# Altium PCB PCBAction.PcbDoc
Units mm, origin at the board's own origin, x right, y up, seen from the top; angles counter-clockwise.
Board outline 93.5 x 70 mm, 2 copper layers (Top Layer, Bottom Layer); 66 components, 68 nets, 274 pads, 15 vias.
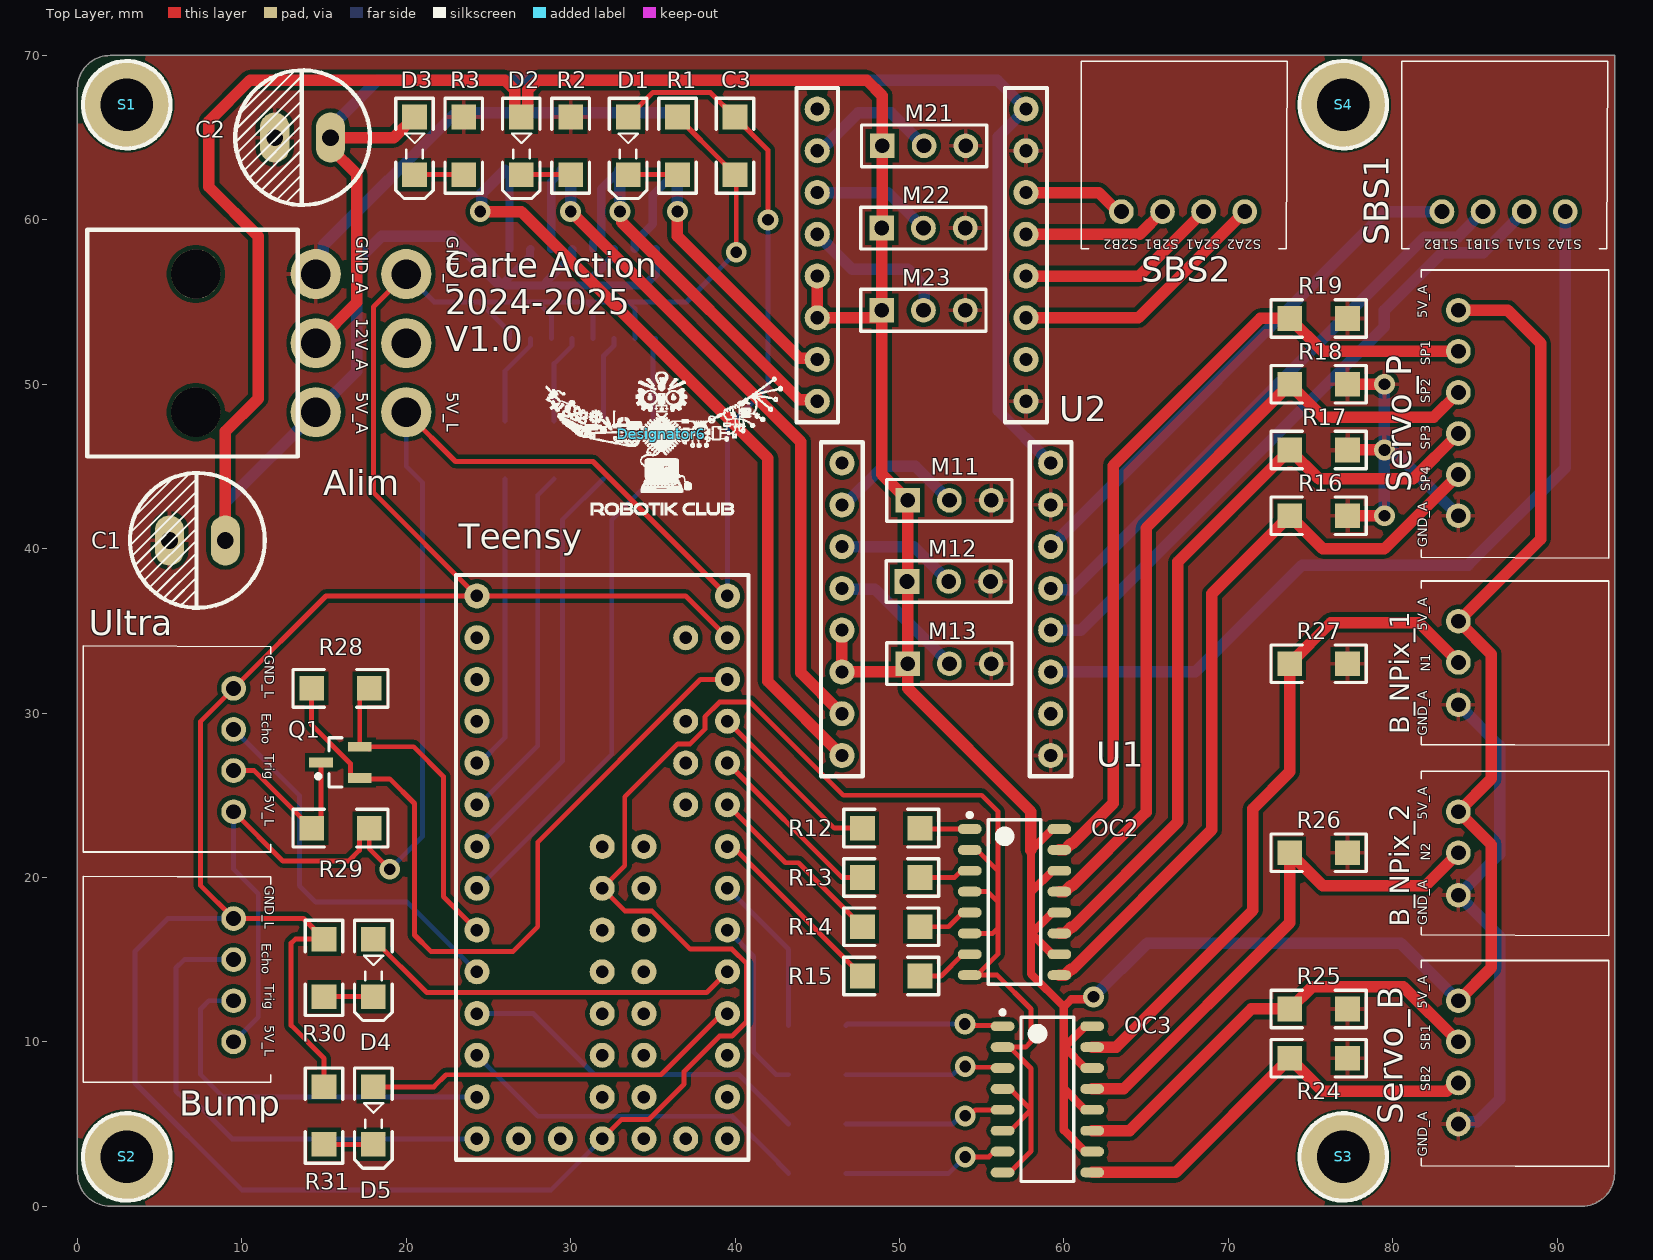
[diagram p0: Top Layer view]
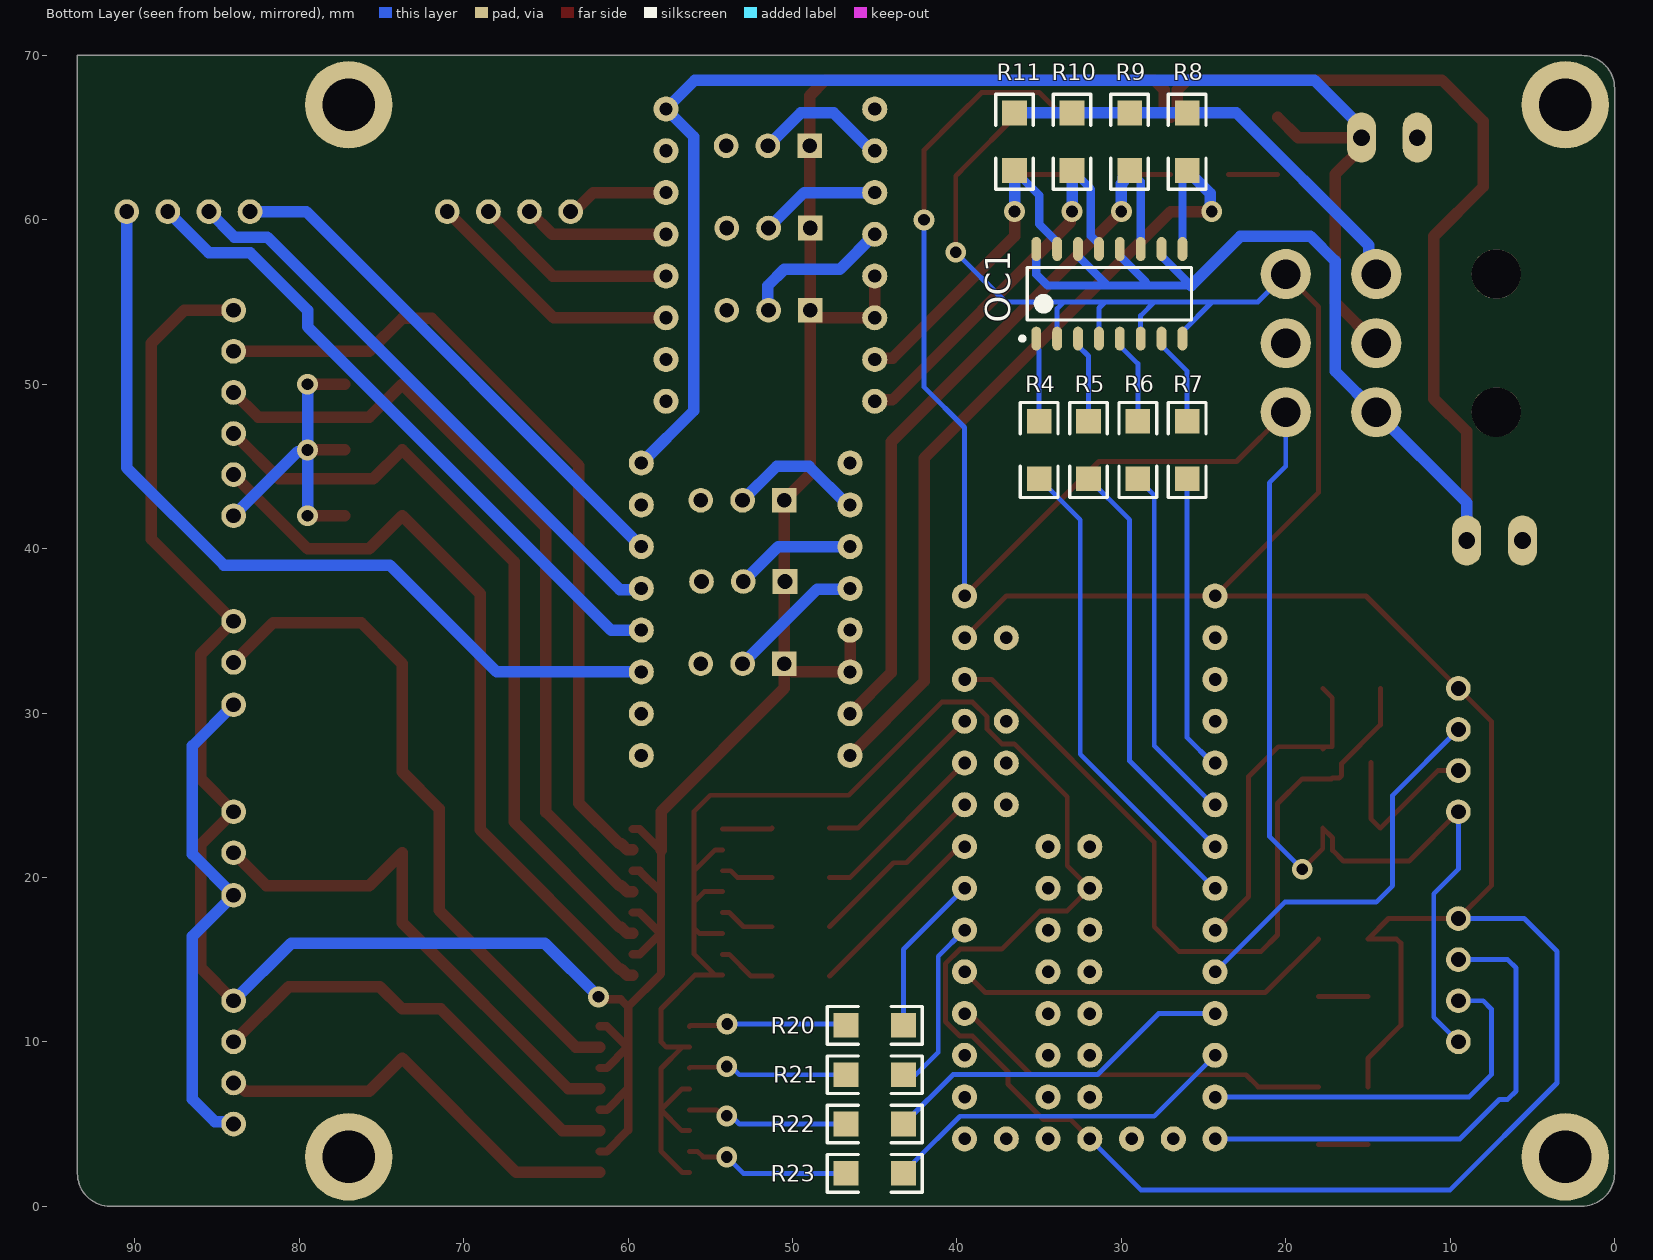
[diagram p1: Bottom Layer view, seen from below]
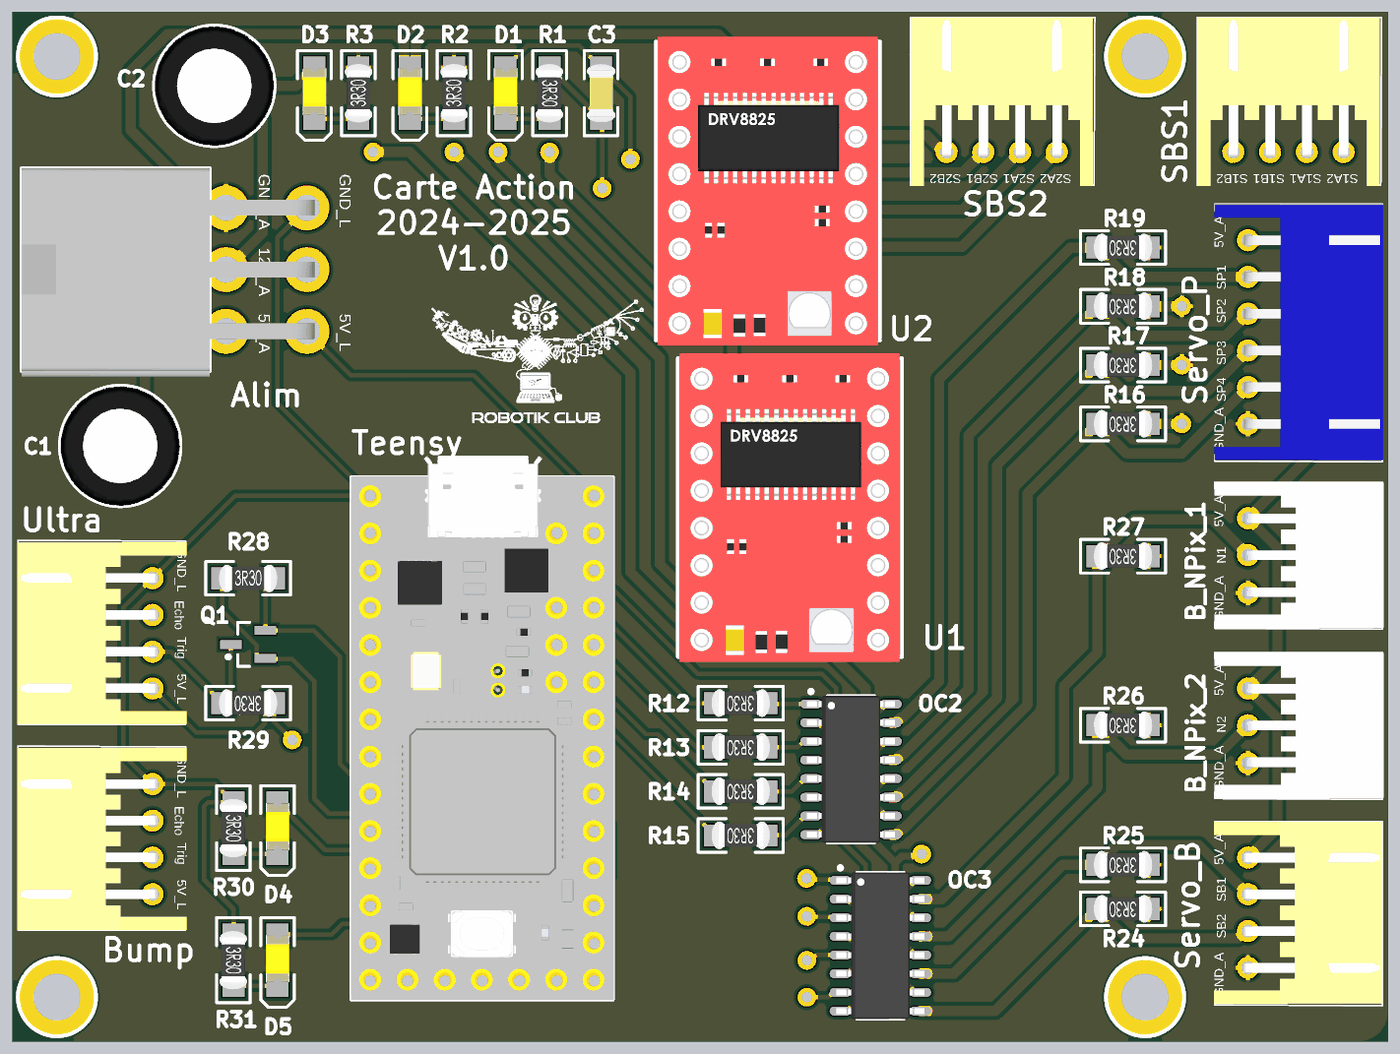
[diagram p2: 3D render of the assembled board from above, using the file's embedded part models]
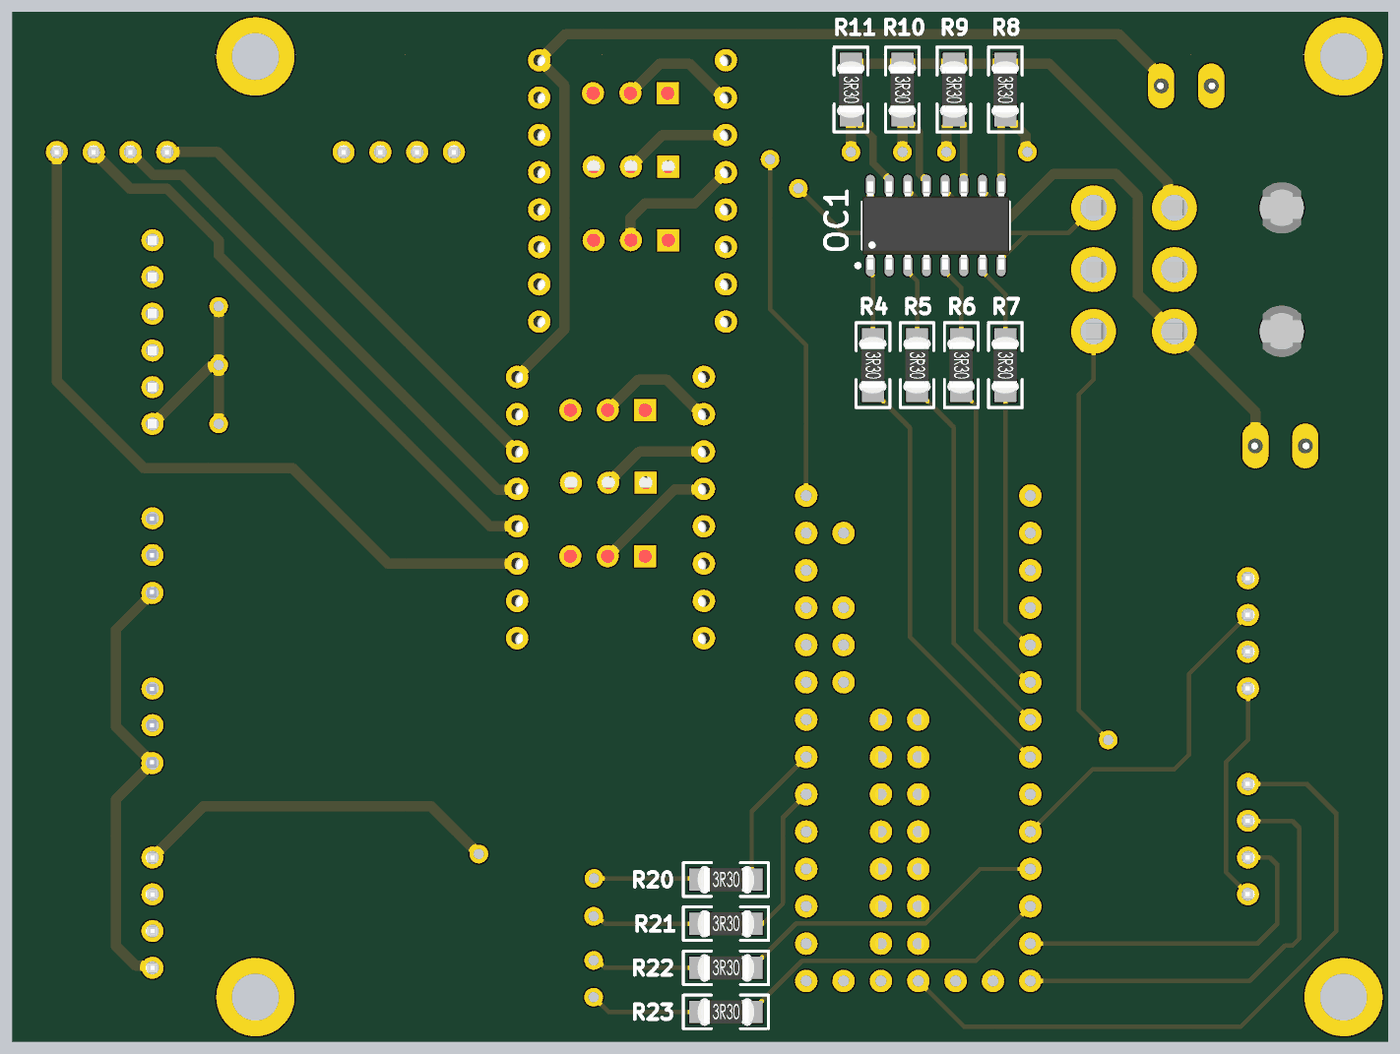
[diagram p3: 3D render of the assembled board from below, using the file's embedded part models]

## Layer stack, top to bottom
Top Solder: solder mask 0.0102, Solder Resist, Dk 3.5
Top Layer: signal copper 0.0356
Dielectric 1: dielectric 0.32, FR-4, Dk 4.8
Bottom Layer: signal copper 0.0356
Bottom Solder: solder mask 0.0102, Solder Resist, Dk 3.5

## Board outline
2,0 91.5,0 ccw(c91.5,2) 93.5,2 93.5,70 2,70 ccw(c2,68) 0,68 0,2 ccw(c2,2)

## Design rules (kind name [scope] priority, off if disabled: settings)
Clearance [All] p1: gap=0.254 ignorepadtopadclearanceinfootprint=FALSE
PolygonConnect [All] p1: connectstyle=Relief reliefconductorwidth=0.254 reliefentries=4 polygonreliefangle="90 Angle" airgapwidth=0.254
RoutingVias [All] p1: holewidth=0.711 width=1.27 viastyle="Through Hole" minholewidth=0.711 minwidth=1.27 maxholewidth=0.711 maxwidth=1.27
SolderMaskExpansion [All] p1: expansion=0.102 istentingtop=FALSE
SupplyNets "Schematic Supply Nets_5" [InNet('5V_A')] p1: voltage=0.000
SupplyNets "Schematic Supply Nets_4" [InNet('GND_L')] p2: voltage=0.000
SupplyNets "Schematic Supply Nets_3" [InNet('5V_L')] p3: voltage=0.000
SupplyNets "Schematic Supply Nets_2" [InNet('GND_A')] p4: voltage=0.000
SupplyNets "Schematic Supply Nets_1" [InNet('3V_L')] p5: voltage=0.000
SupplyNets "Schematic Supply Nets" [InNet('12V_A')] p6: voltage=0.000
Width [All] p1: maxlimit=0.7 minlimit=0.3 preferedwidth=0.7
30 further rules are at their usual default settings.

## Classes and differential pairs
component class SchemaAction: Alim Bump C1 C2 C3 D1 D2 D3 D4 D5 Q1 R1 R2 R3 R28 R29 R30 R31 S1 S2 S3 S4 Teensy Ultra
component class SchemaAction_Actionneurs: B_NPix_1 B_NPix_2 M11 M12 M13 M21 M22 M23 OC1 OC2 OC3 R4 R5 R6 R7 R8 R9 R10 R11 R12 R13 R14 R15 R16 R17 R18 R19 R20 R21 R22 R23 R24 R25 R26 R27 SBS1 SBS2 Servo_B Servo_P U1 U2

## Components (designator, comment, footprint, x,y, rotation, side; value= is the part's Value field where it differs from the comment)
Alim "Header 3X2H" MOLEX_MINIFITJR_3X2 14.5,52.5 r270 top
B_NPix_1 "S3B-XH-A" S3B-XH-A 84,35.58 r270 top
B_NPix_2 "S3B-XH-A" S3B-XH-A 84,24 r270 top
Bump "Header 4H" S4B-XH-A 9.5,10 r90 top
C1 "Cap2" Condensateur 9,40.5 r180 top value=100µF
C2 "Cap2" Condensateur 15.4,65 r180 top value=100µF
C3 "(Optional)" "Capacitor 1206" 40,64.5 r90 top value=10uF
D1 "5V_L" KP-3216SEC 33.5,64.5 r270 top
D2 "5V_A" KP-3216SEC 27,64.5 r270 top
D3 "12V_A" KP-3216SEC 20.5,64.5 r270 top
D4 "LED1" KP-3216SEC 18,14.5 r270 top
D5 "LED2" KP-3216SEC 18,5.516 r270 top
Designator6 "Comment" Logo_lowres 35.5,47 r0 top
M11 "Header 3" HDR1X3 50.5,42.937 r0 top
M12 "Header 3" HDR1X3 50.46,38 r0 top
M13 "Header 3" HDR1X3 50.5,33 r0 top
M21 "Header 3" HDR1X3 48.96,64.5 r0 top
M22 "Header 3" HDR1X3 48.92,59.5 r0 top
M23 "Header 3" HDR1X3 48.92,54.5 r0 top
OC1 "PhotoCoupler" "16 pins SOIC, TI" 30.73,55.5 r90 bottom
OC2 "PhotoCoupler" "16 pins SOIC, TI" 57,18.5 r0 top
OC3 "PhotoCoupler" "16 pins SOIC, TI" 59,6.5 r0 top
Q1 "MOSFET-N" SOT23_M 16,27 r180 top
R1 "Res2" "Resistor 1206" 36.5,64.5 r270 top value=300
R2 "Res2" "Resistor 1206" 30,64.5 r90 top value=300
R3 "Res2" "Resistor 1206" 23.5,64.5 r90 top value=1K3
R4 "Res2" "Resistor 1206" 35,46 r270 bottom value=210
R5 "Res2" "Resistor 1206" 32,46 r270 bottom value=210
R6 "Res2" "Resistor 1206" 29,46 r270 bottom value=210
R7 "Res2" "Resistor 1206" 26,46 r270 bottom value=210
R8 "Res2" "Resistor 1206" 26,64.75 r270 bottom value=10K
R9 "Res2" "Resistor 1206" 29.5,64.75 r270 bottom value=10K
R10 "Res2" "Resistor 1206" 33,64.75 r270 bottom value=10K
R11 "Res2" "Resistor 1206" 36.5,64.75 r270 bottom value=10K
R12 "Res2" "Resistor 1206" 49.5,23 r180 top value=210
R13 "Res2" "Resistor 1206" 49.5,20 r180 top value=210
R14 "Res2" "Resistor 1206" 49.5,17 r180 top value=210
R15 "Res2" "Resistor 1206" 49.5,14 r180 top value=210
R16 "Res2" "Resistor 1206" 75.5,42 r180 top value=10K
R17 "Res2" "Resistor 1206" 75.5,46 r180 top value=10K
R18 "Res2" "Resistor 1206" 75.5,50 r180 top value=10K
R19 "Res2" "Resistor 1206" 75.5,54 r180 top value=10K
R20 "Res2" "Resistor 1206" 45,11 r180 bottom value=210
R21 "Res2" "Resistor 1206" 45,8 r180 bottom value=210
R22 "Res2" "Resistor 1206" 45,5 r180 bottom value=210
R23 "Res2" "Resistor 1206" 45,2 r180 bottom value=210
R24 "Res2" "Resistor 1206" 75.5,9 r180 top value=10K
R25 "Res2" "Resistor 1206" 75.5,12 r180 top value=10K
R26 "Res2" "Resistor 1206" 75.5,21.5 r180 top value=10K
R27 "Res2" "Resistor 1206" 75.5,33 r180 top value=10K
R28 "Res2" "Resistor 1206" 16,31.5 r0 top value=10K
R29 "Res2" "Resistor 1206" 16,23 r180 top value=10K
R30 "Res2" "Resistor 1206" 15,14.5 r270 top value=300
R31 "Res2" "Resistor 1206" 15,5.516 r270 top value=300
S1 "Screw M3" "Screw M3" 3,67 r0 top
S2 "Screw M3" "Screw M3" 3,3 r0 top
S3 "Screw M3" "Screw M3" 77,3 r0 top
S4 "Screw M3" "Screw M3" 77,67 r0 top
SBS1 "Header 4" S4B-XH-A 83,60.5 r0 top
SBS2 "Header 4" S4B-XH-A 63.5,60.5 r0 top
Servo_B "Header 4H" S4B-XH-A 84,12.5 r270 top
Servo_P "Header 6H" S6B-XH-A 84,54.5 r270 top
Teensy "Teensy 3.2" teensy 21.76,16.8 r0 top
U1 "DRV8825" DRV8825 46.5,45.2 r0 top
U2 "DRV8825" DRV8825 45,66.74 r0 top
Ultra "Header 4H" S4B-XH-A 9.5,24 r90 top

## Footprints (in the part's own frame and the unit in brackets; to place one, negate y for a bottom-side part, rotate by r counter-clockwise, add the part's x,y. Pads: shape width x height; smd on the part's side, far side on the other; paste and mask are expansions set on the pad)
"16 pins SOIC, TI" [mm] "SOIC, 16-Leads, Body 9,90x3,90mm, Pitch 1,27mm, IPC Medium Density"
  oval 1.45x0.6 smd: 1(-2.725,4.445) 2(-2.725,3.175) 3(-2.725,1.905) 4(-2.725,0.635) 5(-2.725,-0.635) 6(-2.725,-1.905) 7(-2.725,-3.175) 8(-2.725,-4.445) 9(2.725,-4.445) 10(2.725,-3.175) 11(2.725,-1.905) 12(2.725,-0.635) 13(2.725,0.635) 14(2.725,1.905) 15(2.725,3.175) 16(2.725,4.445)
  silkscreen extent -2.85,-5 1.6,5.42, body extent -3,-5 3,5, height 1.75
"Capacitor 1206" [mm]
  rect 1.5x1.5 smd: 1(-1.75,0) 2(1.75,0)
  silkscreen extent -2.89,-1.14 2.89,1.14, body extent -1.98,-0.99 1.98,0.96, height 1.3
Condensateur [mil]
  oval 70x120 hole 40: 1(0,0) 2(133.86,0)
  silkscreen extent -94,-161 228,161, body extent -93,-160 227,160, height 500
DRV8825 [mil] "Stepper Driver"
  round 60 hole 31.5: 1(0,0) 2(0,-100) 3(0,-200) 4(0,-300) 5(0,-400) 6(0,-500) 7(0,-600) 8(0,-700) 9(500,-700) 10(500,-600) 11(500,-500) 12(500,-400) 13(500,-300) 14(500,-200) 15(500,-100) 16(500,0)
  silkscreen extent -50,-750 550,50, body extent -50,-764 550,63, height 446
HDR1X3 [mm] "Connector; Header; 3 Position"
  rect 1.5x1.5 hole 0.9: 1(0,0)
  round 1.5 hole 0.9: 2(2.54,0) 3(5.08,0)
  silkscreen extent -1.27,-1.27 6.35,1.27
KP-3216SEC [mm]
  rect 1.5x1.5 smd: 1(-1.75,0) 2(1.75,0)
  silkscreen extent -2.89,-1.14 3.2,1.14, body extent -1.7,-0.79 1.5,0.81, height 1.1
Logo_lowres [mm]
  silkscreen extent -7.01,-4.93 7.39,3.76
MOLEX_MINIFITJR_3X2 [mm] "MOLEX_MINIFITJR_3X2, 39-30-1060"
  round 3.048 hole 1.8: 1(-4.2,5.5) 2(-4.2,0) 3(0,5.5) 4(0,0) 5(4.2,5.5) 6(4.2,0)
  round 3 hole 3 unplated: 10(-4.2,-7.3) 11(4.2,-7.3)
  silkscreen extent -6.9,-13.9 6.9,-1.1, body extent -6.9,-13.9 7.3,6.04, height 11.41
"Resistor 1206" [mm]
  rect 1.5x1.5 smd: 1(-1.75,0) 2(1.75,0)
  silkscreen extent -2.89,-1.14 2.89,1.14, body extent -1.98,-0.95 1.98,0.93, height 0.55
S3B-XH-A [mm]
  round 1.5 hole 0.9: 1(0,0) 2(2.5,0) 3(5.08,0)
  silkscreen extent -2.45,-2.26 7.54,9.14, body extent -2.44,-2.27 7.46,9.23, height 6.15
S4B-XH-A [mm]
  round 1.5 hole 0.9: 1(0,0) 2(2.5,0) 3(5,0) 4(7.5,0)
  silkscreen extent -2.45,-2.26 10.08,9.14, body extent -2.44,-2.32 9.96,9.18, height 6.15
S6B-XH-A [mm]
  round 1.5 hole 0.9: 1(0,0) 2(2.5,0) 3(5,0) 4(7.5,0) 5(10,0) 6(12.5,0)
  silkscreen extent -2.45,-2.26 15.08,9.14, body extent -2.45,-2.3 14.95,9.2, height 6.15
"Screw M3" [mm] "M3 iso Screw"
  round 5.32 hole 3.2 unplated: 0(0,0)
  silkscreen extent -2.66,-2.66 2.66,2.66
SOT23_M [mm] "SOT23, 3-Leads, Body 2.9x1.3mm, Pitch 0.95mm, Lead Span 2.3mm - Reverse Pinning, IPC Low Density"
  rect 1.45x0.6 smd: 1(1.175,0) 2(-1.175,-0.95) 3(-1.175,0.95)
  silkscreen extent -0.1,-1.5 1.47,1.5, body extent -0.7,-1.5 0.7,1.5, height 1.1
teensy [mil] "Teensy 3.2"
  round 60 hole 30: 0(100,700) 1(100,600) 2(100,500) 3(100,400) 4(100,300) 5(100,200) 6(100,100) 7(100,0) 8(100,-100) 9(100,-200) 10(100,-300) 11(100,-400) 12(100,-500) 13(700,-500) 14(700,-400) 15(700,-300) 16(700,-200) 17(700,-100) 18(700,0) 19(700,100) 20(700,200) 21(700,300) 22(700,400) 23(700,500) 24(400,0) 25(400,-100) 26(400,-200) 27(400,-300) 28(400,-400) 29(500,-400) 30(500,-300) 31(500,-200) 32(500,-100) 33(500,0) 34(600,400) 35(600,300) 36(400,200) 37(500,200) 38(600,500) 39(500,100) 40(400,100) 41(700,600) 42(700,700) 43(700,800) 44(100,800) 45(600,-500) 46(500,-500) 47(400,-500) 48(300,-500) 49(200,-500) 50(600,700)
  silkscreen extent 50,-550 750,850, body extent 48,-550 752,907, height 505

## Part data
Alim: "Header, 3-Pin, Dual row, Right Angle", LatestRevisionDate=17-Jul-2002, LatestRevisionNote="Re-released for DXP Platform.", Publisher="Altium Limited"
B_NPix_1 B_NPix_2: library part "Header 3H", "Header, 3-Pin, Right Angle", LatestRevisionDate=17-Jul-2002, LatestRevisionNote="Re-released for DXP Platform.", Publisher="Altium Limited"
Bump Servo_B Ultra: "Header, 4-Pin, Right Angle", LatestRevisionDate=17-Jul-2002, LatestRevisionNote="Re-released for DXP Platform.", Publisher="Altium Limited"
C1 C2: "Capacitor", PackageDescription="Capacitor; 2 Leads", PackageReference=CAPR5-4X5, Published=23-Sep-2002, Publisher="Altium Limited"
C3: library part Cap, "Capacitor", LatestRevisionDate=17-Jul-2002, LatestRevisionNote="Re-released for DXP Platform.", PackageDescription="Radial Cap, Thru-Hole; 2 Leads; 0.3 in Pin Spacing", PackageReference=RAD-0.3, Published=8-Jun-2000, Publisher="Altium Limited"
D1 D2 D3 D4: library part LED2, "Typical RED, GREEN, YELLOW, AMBER GaAs LED", LatestRevisionDate=17-Jul-2002, LatestRevisionNote="Re-released for DXP Platform.", PackageDescription="SM LED; 2 Flat Leads", PackageReference=3.2X1.6X1.1, PackageVersion=Feb-2002, Published=8-Jun-2000, Publisher="Altium Limited"
D5: "Typical RED, GREEN, YELLOW, AMBER GaAs LED", LatestRevisionDate=17-Jul-2002, LatestRevisionNote="Re-released for DXP Platform.", PackageDescription="SM LED; 2 Flat Leads", PackageReference=3.2X1.6X1.1, PackageVersion=Feb-2002, Published=8-Jun-2000, Publisher="Altium Limited"
M11 M12 M13 M21 M22 M23: "Header, 3-Pin", LatestRevisionDate=17-Jul-2002, LatestRevisionNote="Re-released for DXP Platform.", Publisher="Altium Limited"
OC1 OC2 OC3: library part LTV-247, "Integrated Circuit", Manufacturer_Name=Lite-On, Mouser Part Number=859-LTV-247, Arrow Part Number=LTV-247, Arrow Price/Stock=https://www.arrow.com/en/products/ltv-247/lite-on-technology, Datasheet Link=http://optoelectronics.liteon.com/upload/download/DS70-2009-0014/LTV-2X7%20sereis%20Mar17.PDF, Manufacturer_Part_Number=LTV-247, Mouser Price/Stock=https://www.mouser.co.uk/ProductDetail/Lite-On/LTV-247/?qs=9ayhpukWNmvWpoxQBzWkFA%3D%3D
Q1: "N-Channel MOSFET", LatestRevisionDate=17-Jul-2002, LatestRevisionNote="Re-released for DXP Platform.", PackageDescription="TO, Flat Index; 3 In-Line, Axial Leads; Body Dia. 4.6mm; Lead Dia. 0.5 mm (max)", PackageReference=E3, PackageVersion=1995/1996, Published=8-Jun-2000, Publisher="Altium Limited"
R1 R2 R3 R4 R5 R6 R7 R8 R9 R10 R11 R12 R13 R14 R15 R16 R17 R18 R19 R20 R21 R22 R23 R24 R25 R26 R27 R28 R29 R30 R31: "Resistor", LatestRevisionDate=17-Jul-2002, LatestRevisionNote="Re-released for DXP Platform.", PackageDescription="Axial Device, Thru-Hole; 2 Leads; 0.4 in Pin Spacing", PackageReference=AXIAL-0.4, Published=8-Jun-2000, Publisher="Altium Limited"
SBS1 SBS2: "Header, 4-Pin", LatestRevisionDate=17-Jul-2002, LatestRevisionNote="Re-released for DXP Platform.", Publisher="Altium Limited"
Servo_P: "Header, 6-Pin, Right Angle", LatestRevisionDate=17-Jul-2002, LatestRevisionNote="Re-released for DXP Platform.", Publisher="Altium Limited"
Teensy: library part teensy3.2
U1 U2: "Stepper Driver Module"

## Via types
v1: diameter 1.27, hole 0.711, Top Layer to Bottom Layer, 15 vias

## Nets (pads, with @x,y where several pads share a name; then routed paths per layer and width w, separated by ;. In a path a pad name is that pad's centre, name@x,y a point inside that pad or via, vN(x,y) a via of type N, cw(c..) or ccw(c..) an arc to the next point about the centre after c; other vN are vias at no path point)
3V_L: Q1.3 R28.1 Teensy.41 | length 48.2
  Top Layer w0.3: R28.1 14.25,29.279 16.6,26.929 16.6,26.2 16.75,26.05 Q1.3 17.225,26 19,26 20.5,24.5 20.5,16.5 21.5,15.5 26.5,15.5 28,17 28,22.149 37.891,32.04 Teensy.41 Teensy.41@39.52,32.04
5V_A: Alim.6 B_NPix_1.1 B_NPix_2.1 C1.1 D2.1 M11.1 M12.1 M13.1 M21.1 M22.1 M23.1 OC1.10 OC1.12 OC1.14 OC1.16 OC2.10 OC2.12 OC2.14 OC2.16 OC3.10 OC3.12 OC3.14 OC3.16 Servo_B.1 Servo_P.1 U1.5 U1.6 U2.5 U2.6 | length 301.5
  Top Layer w0.5: OC2.10 59.3,15.325 58,16.625 ; OC2.12 59.3,17.865 58.06,16.625 58,16.625 ; OC2.14 59.3,20.405 58.03,19.135 58,19.135 ; OC2.16 59.3,22.945 58,21.645 58,19.135 ; OC3.10 61.3,3.325 60,4.625 60,7.135 ; OC3.12 61.3,5.865 60.03,7.135 60,7.135 ; OC3.14 61.3,8.405 60.06,9.645 60,9.645 ; OC3.16 61.3,10.945 60,9.645 ; v1(61.807,12.737) 61.659,12.59 60.455,12.59 60,12.135 ; 58,16.625 58,14.135 60,12.135 ; 58,16.625 58,19.135 ; 60,7.135 60,9.645 ; 60,9.645 60,12.135
  Top Layer w0.7: C1.1 9,47.124 11,49.124 11,59 8,62 8,66 10.5,68.5 26,68.5 26.6,67.9 26.6,66.65 D2.1 27.4,66.65 27.4,67.9 28,68.5 48,68.5 48.96,67.54 M21.1 48.94,64.48 48.94,59.52 M22.1 M23.1 ; U2.5 U2.6 48.46,54.04 M23.1 ; U1.5 U1.6 50,32.5 M13.1 ; 58,21.645 58,24 50.5,31.5 M13.1 ; Servo_B.1 86,14.5 86,22 B_NPix_2.1 86,26 86,33.58 B_NPix_1.1 89,40.58 89,52.5 87,54.5 Servo_P.1 ; M23.1 48.92,44.517 M11.1 M13.1
  Bottom Layer w0.5: OC1.10 27.522,58.192 27.522,57.767 25.755,56 28.5,56 ; OC1.12 30.095,57.8 28.5,56.205 28.5,56 ; OC1.14 32.635,57.8 30.835,56 ; OC1.16 35.175,56.675 34.5,56 30.835,56 ; 28.5,56 30.835,56
  Bottom Layer w0.7: C1.1 9,42.8 Alim.6 17,50.8 17,57.5 18.5,59 22.755,59 25.755,56 ; v1(61.807,12.737) 65.069,16 80.5,16 Servo_B.1
5V_L: Alim.5 Bump.1 C3.2 D1.1 R29.1 Teensy.43 Ultra.1 | length 121
  Top Layer w0.3: Ultra.1 12.5,21 16.5,21 17.15,21.65 17.15,22.4 R29.1 17.75,21.75 v1(19,20.5) ; Alim.5 23,45.3 31.36,45.3 Teensy.43 ; D1.1 34.996,67.746 38.504,67.746 C3.2 42,64.25 v1(42,60)
  Bottom Layer w0.3: Bump.1 11,11.5 11,19 9.5,20.5 Ultra.1 ; v1(19,20.5) 21,22.5 21,44 20,45 Alim.5 ; Teensy.43 39.54,47.364 42,49.824 v1(42,60)
12V_A: Alim.4 C2.1 D3.1 U1.16 U2.16 | length 88.2
  Top Layer w0.7: Alim.4 17,55 17,62.765 15.4,64.365 C2.1 19.25,65 D3.1
  Bottom Layer w0.7: C2.1 15.4,65.635 18.265,68.5 55.94,68.5 U2.16 56,65.04 56,48.4 U1.16
GND_A: Alim.2 B_NPix_1.3 B_NPix_2.3 C1.2 C2.2 M11.3 M12.3 M13.3 M21.3 M22.3 M23.3 R2.2 R3.2 R8.1 R9.1 R10.1 R11.1 R16.1 R17.1 R18.1 R19.1 R24.1 R25.1 R26.1 R27.1 Servo_B.4 Servo_P.6 U1.9 U1.15 U2.9 U2.15 | length 78
  Top Layer w0.7: R16.1 v1(79.5,42) ; R17.1 v1(79.5,46) ; R18.1 v1(79.5,50)
  Bottom Layer w0.7: Alim.2 14.949,57.149 14.949,58.449 23,66.5 R8.1 R9.1 R10.1 R11.1 ; v1(79.5,42) v1(79.5,46) ; v1(79.5,50) v1(79.5,46) ; Servo_B.4 84.153,5.153 85.153,5.153 86.5,6.5 86.5,16.42 B_NPix_2.3 86.5,21.42 86.5,28 B_NPix_1.3 ; Servo_P.6 80.109,45.891 79.609,45.891 v1(79.5,46)
GND_L: Alim.1 Bump.4 C3.1 OC1.2 OC1.4 OC1.6 OC1.8 OC2.2 OC2.4 OC2.6 OC2.8 OC3.2 OC3.4 OC3.6 OC3.8 R1.1 R30.1 R31.1 Teensy.40 Teensy.42 Teensy.44 Teensy.47 Ultra.4 | length 278.5
  Top Layer w0.3: R31.1 15,9 13,11 13,16 13.25,16.25 R30.1 13.75,17.5 Bump.4 7.5,19.5 7.5,29.5 Ultra.4 15.12,37.12 Teensy.44 ; Alim.1 18,54.7 18,43.42 Teensy.44 ; Teensy.47 33.086,5.266 34.735,5.266 36.896,7.427 36.896,8.185 39.057,10.346 39.815,10.346 40.706,11.237 40.706,14.743 39.815,15.634 37.275,15.634 34.943,17.966 33.294,17.966 Teensy.40 33.294,20.714 33.294,24.903 36.517,28.126 37.275,28.126 38.166,29.017 38.166,29.775 39.057,30.666 40.917,30.666 46.583,25 55,25 56,24 56,20.375 ; R1.1 39.4,63.35 C3.1 40.076,62.674 v1(40.076,58.026) ; Teensy.42 37,37.12 Teensy.44 ; OC2.8 OC2.8@54.7,14.055 ; OC2.6 55.667,16.595 56,16.928 ; OC2.4 55.365,19.135 56,18.5 ; OC2.2 54.7,21.675 56,20.375 ; OC3.8 56.7,2.055 58,3.355 58,5.865 ; OC3.6 56.73,4.595 58,5.865 ; OC3.4 56.73,7.135 58,5.865 ; OC3.2 OC3.2@56.7,9.675 ; OC2.8@54.7,14.055 55.945,14.055 58,12 58,10 57.675,9.675 OC3.2@56.7,9.675 ; OC2.8@54.7,14.055 56,15.355 56,16.928 ; 56,16.928 56,18.5 ; 56,18.5 56,20.375 ; OC3.2@56.7,9.675 58,8.375 58,5.865
  Bottom Layer w0.3: Bump.4 5.5,17.5 3.5,15.5 3.5,7.5 10,1 28.82,1 Teensy.47 ; Alim.1 21.7,55 24.485,55 ; OC1.8 26.285,53.2 24.485,55 ; OC1.6 28.825,54.175 28,55 ; OC1.4 31.365,54.635 31,55 ; OC1.2 33.905,54.595 33.5,55 ; v1(40.076,58.026) 37.05,55 33.5,55 ; 24.485,55 28,55 ; 28,55 31,55 ; 31,55 33.5,55
LED_1: D4.1 Teensy.17 | length 23.4
  Top Layer w0.3: D4.1 21.25,13 38.28,13 Teensy.17
LED_2: D5.1 Teensy.16 | length 23.4
  Top Layer w0.3: D5.1 21.683,7.266 22.417,8 35.5,8 39.22,11.72 Teensy.16
NetD1_2: D1.2 R1.2 | length 3
  Top Layer w0.3: D1.2 R1.2
NetD2_2: D2.2 R2.1 | length 3
  Top Layer w0.3: D2.2 R2.1
NetD3_2: D3.2 R3.1 | length 3
  Top Layer w0.3: D3.2 R3.1
NetD4_2: D4.2 R30.2 | length 3
  Top Layer w0.3: R30.2 D4.2
NetD5_2: D5.2 R31.2 | length 3
  Top Layer w0.3: R31.2 D5.2
NetOC1_1: OC1.1 R4.1 | length 5.1
  Bottom Layer w0.3: R4.1 35,52.094 35.175,52.269 OC1.1
NetOC1_3: OC1.3 R5.1 | length 5.3
  Bottom Layer w0.3: R5.1 32,51.715 32.635,52.35 OC1.3
NetOC1_5: OC1.5 R6.1 | length 5.5
  Bottom Layer w0.3: R6.1 29,51.255 30.095,52.35 OC1.5
NetOC1_7: OC1.7 R7.1 | length 5.7
  Bottom Layer w0.3: R7.1 26,50.795 27.555,52.35 OC1.7
NetOC2_1: OC2.1 R12.1 | length 3
  Top Layer w0.3: R12.1 51.305,22.945 OC2.1
NetOC2_3: OC2.3 R13.1 | length 3.2
  Top Layer w0.3: R13.1 53.364,20 53.769,20.405 OC2.3
NetOC2_5: OC2.5 R14.1 | length 3.4
  Top Layer w0.3: R14.1 52.985,17 53.85,17.865 OC2.5
NetOC2_7: OC2.7 R15.1 | length 3.6
  Top Layer w0.3: R15.1 52.525,14 53.85,15.325 OC2.7
NetOC3_1: OC3.1 R20.1 | length 9.6
  Top Layer w0.3: v1(53.978,11.084) 54.059,11.002 56.218,11.002 OC3.1
  Bottom Layer w0.3: R20.1 46.834,11.084 v1(53.978,11.084)
NetOC3_3: OC3.3 R21.1 | length 9.8
  Top Layer w0.3: v1(54,8.5) 54.048,8.453 56.227,8.453 OC3.3
  Bottom Layer w0.3: R21.1 53.238,8 53.738,8.5 v1(54,8.5)
NetOC3_5: OC3.5 R22.1 | length 9.9
  Top Layer w0.3: v1(54,5.5) 54.262,5.5 54.627,5.865 OC3.5
  Bottom Layer w0.3: R22.1 53.238,5 53.738,5.5 v1(54,5.5)
NetOC3_7: OC3.7 R23.1 | length 10.1
  Top Layer w0.3: v1(54,3) 55.444,3 55.769,3.325 OC3.7
  Bottom Layer w0.3: R23.1 53,2 v1(54,3)
O_B_Neopixel_1: B_NPix_1.2 OC3.15 R27.2 | length 41.4
  Top Layer w0.7: OC3.15 63.175,9.675 71.5,18 71.5,24.175 73.75,26.425 R27.2 76.25,35.5 81.58,35.5 B_NPix_1.2
O_B_Neopixel_2: B_NPix_2.2 OC3.13 R26.2 | length 32.4
  Top Layer w0.7: OC3.13 63.635,7.135 73.75,17.25 R26.2 75.75,19.5 82,19.5 B_NPix_2.2
O_SBS_Dir_1: OC1.11 R9.2 U1.7 | length 45.1
  Top Layer w0.7: v1(30,60.5) 44,46.5 44,32.46 U1.7
  Bottom Layer w0.5: OC1.11 28.825,62.325 R9.2
  Bottom Layer w0.7: R9.2 29.9,62.6 29.9,62.285 30,62.185 v1(30,60.5)
O_SBS_Dir_2: OC1.15 R11.2 U2.7 | length 21.5
  Top Layer w0.7: v1(36.5,60.5) 36.5,59 43.919,51.581 44.919,51.581 U2.7
  Bottom Layer w0.5: OC1.15 33.905,58.65 35,59.745 35,61.5 R11.2
  Bottom Layer w0.7: v1(36.5,60.5) R11.2
O_SBS_Step_1: OC1.9 R8.2 U1.8 | length 51.7
  Top Layer w0.7: v1(24.5,60.5) 27,60.5 42,45.5 42,31.92 U1.8
  Bottom Layer w0.5: R8.2 26.285,62.715 OC1.9
  Bottom Layer w0.7: v1(24.5,60.5) 24.609,60.609 24.609,61.609 R8.2
O_SBS_Step_2: OC1.13 R10.2 U2.8 | length 25.1
  Top Layer w0.7: v1(33,60.5) 33.109,60.391 33.109,59.86 43.923,49.046 44.914,49.046 U2.8
  Bottom Layer w0.5: OC1.13 31.365,58.623 31.411,58.669 31.517,58.669 31.861,59.013 31.861,61.861 R10.2
  Bottom Layer w0.7: v1(33,60.5) R10.2
O_Servo_B1: OC3.11 R25.2 Servo_B.2 | length 27.3
  Top Layer w0.7: OC3.11 63.997,4.595 71.402,12 R25.2 75.104,13.354 80.646,13.354 Servo_B.2
O_Servo_B2: OC3.9 R24.2 Servo_B.3 | length 26.2
  Top Layer w0.7: OC3.9 66.805,2.055 R24.2 75.75,7 83.284,7 83.784,7.5 Servo_B.3
O_Servo_P1: OC2.15 R19.2 Servo_P.2 | length 50.5
  Top Layer w0.7: OC2.15 60.05,21.675 60.416,22.041 60.524,22.041 63,24.517 63,45.05 71.95,54 R19.2 75.75,52 Servo_P.2
O_Servo_P2: OC2.13 R18.2 Servo_P.3 | length 48.6
  Top Layer w0.7: OC2.13 60.05,19.135 60.416,19.501 60.524,19.501 65,23.977 65,41.25 R18.2 75.75,48 82.5,48 Servo_P.3
O_Servo_P3: OC2.11 R17.2 Servo_P.4 | length 47.6
  Top Layer w0.7: OC2.11 60.05,16.595 60.416,16.961 60.524,16.961 66.937,23.374 66.937,39.187 R17.2 75.5,44.25 81.25,44.25 Servo_P.4
O_Servo_P4: OC2.9 R16.2 Servo_P.5 | length 47
  Top Layer w0.7: OC2.9 60.05,14.055 60.416,14.421 60.524,14.421 69,22.897 69,37.25 R16.2 75.75,40 79.5,40 Servo_P.5
SBS1_A1: SBS1.3 U1.12 | length 40.1
  Top Layer w0.7: U1.12@59.2,35.115 U1.12 U1.12@59.22,35.02
  Bottom Layer w0.7: U1.12@59.2,35.115 U1.12 61.04,35.04 79.5,53.5 79.5,54.5 83,58 85.5,58 SBS1.3
SBS1_A2: SBS1.4 U1.11 | length 52
  Bottom Layer w0.7: U1.11 68,32.5 74.5,39 84.59,39 90.5,44.91 SBS1.4
SBS1_B1: SBS1.2 U1.13 | length 36
  Top Layer w0.7: U1.13@59.2,37.615 U1.13 U1.13@59.24,37.54
  Bottom Layer w0.7: U1.13@59.2,37.615 U1.13 59.28,37.5 60.5,37.5 81.954,58.954 83.954,58.954 SBS1.2
SBS1_B2: SBS1.1 U1.14 | length 32.5
  Top Layer w0.7: U1.14 U1.14@59.358,40.278
  Bottom Layer w0.7: U1.14 79.58,60.5 SBS1.1
SBS2_A1: SBS2.3 U2.12 | length 12.5
  Top Layer w0.7: U2.12@57.74,56.54 U2.12 64.58,56.58 SBS2.3
SBS2_A2: SBS2.4 U2.11 | length 16
  Top Layer w0.7: U2.11@57.72,54.02 U2.11 64.54,54.04 SBS2.4
SBS2_B1: SBS2.2 U2.13 | length 9
  Top Layer w0.7: U2.13@57.76,59.06 U2.13 64.62,59.12 SBS2.2
SBS2_B2: SBS2.1 U2.14 | length 6.4
  Top Layer w0.7: U2.14@57.78,61.58 U2.14 62.124,61.66 63.284,60.5 SBS2.1
SBS_M0_1: M11.2 U1.2 | length 8.4
  Bottom Layer w0.7: U1.2 46.66,42.66 49,45 50.977,45 M11.2
SBS_M0_2: M21.2 U2.2 | length 8.3
  Bottom Layer w0.7: U2.2 45.2,64.2 47.5,66.5 49.5,66.5 M21.2
SBS_M1_1: M12.2 U1.3 | length 7.4
  Bottom Layer w0.7: U1.3 50.88,40.12 M12.2
SBS_M1_2: M22.2 U2.3 | length 7.4
  Bottom Layer w0.7: U2.3 49.3,61.66 M22.2
SBS_M2_1: M13.2 U1.4 | length 8.4
  Bottom Layer w0.7: U1.4 46.538,37.542 48.498,37.542 M13.2
SBS_M2_2: M23.2 U2.4 | length 9.3
  Bottom Layer w0.7: U2.4 47.12,57 50.5,57 51.5,56 51.5,54.54 M23.2
T_B_Neopixel_1: R20.2 Teensy.19 | length 9.9
  Bottom Layer w0.3: Teensy.19 43.25,15.63 R20.2
T_B_Neopixel_2: R21.2 Teensy.18 | length 10.8
  Bottom Layer w0.3: Teensy.18 41.137,15.203 41.137,9.363 42.5,8 R21.2
T_Bump_1: Bump.2 Teensy.11 | length 23.6
  Bottom Layer w0.3: Bump.2 8,12.5 7.5,12 7.5,8 8.86,6.64 Teensy.11
T_Bump_2: Bump.3 Teensy.12 | length 30.7
  Bottom Layer w0.3: Bump.3 6.5,15 6,14.5 6,7 6.5,6.5 7,6.5 9.4,4.1 Teensy.12
T_SBS_Dir_1: R6.2 Teensy.4 | length 21.8
  Bottom Layer w0.3: Teensy.4 24.42,24.42 28,28 28,43.25 R6.2
T_SBS_Dir_2: R4.2 Teensy.6 | length 29.4
  Bottom Layer w0.3: Teensy.6 24.34,19.34 32.5,27.5 32.5,41.75 R4.2
T_SBS_Step_1: R7.2 Teensy.3 | length 18.1
  Bottom Layer w0.3: Teensy.3 24.46,26.96 26,28.5 R7.2
T_SBS_Step_2: R5.2 Teensy.5 | length 25.6
  Bottom Layer w0.3: Teensy.5 29.5,27.08 29.5,41.75 R5.2
T_Servo_B1: R22.2 Teensy.9 | length 21.7
  Bottom Layer w0.3: Teensy.9 27.731,11.72 31.437,8.014 40.236,8.014 R22.2
T_Servo_B2: R23.2 Teensy.10 | length 21.9
  Bottom Layer w0.3: Teensy.10 28.006,5.474 39.815,5.474 42.65,2.639 42.65,2.6 R23.2
T_Servo_P1: R12.2 Teensy.23 | length 10.9
  Top Layer w0.3: Teensy.23 46.04,23 R12.2
T_Servo_P2: R13.2 Teensy.22 | length 11.1
  Top Layer w0.3: Teensy.22 46.5,20 R13.2
T_Servo_P3: R14.2 Teensy.21 | length 11.3
  Top Layer w0.3: Teensy.21 43.067,20.893 43.857,20.893 R14.2
T_Servo_P4: R15.2 Teensy.20 | length 11.5
  Top Layer w0.3: Teensy.20 39.87,21.88 R15.2
T_Ultra_Echo: Teensy.8 Ultra.3 | length 24.2
  Bottom Layer w0.3: Ultra.3@9.53,29 Ultra.3 13.5,25 13.5,19.5 14.5,18.5 20.06,18.5 Teensy.8 Teensy.8@24.27,14.26
T_Ultra_Trig: Q1.2 R28.2 Teensy.7 | length 20.2
  Top Layer w0.3: Q1.2@17.6,27.95 Q1.2@17.75,27.8 ; R28.2 17.175,30.925 Q1.2 20.45,27.95 22.258,26.142 22.258,18.842 Teensy.7 Teensy.7@24.188,16.912
Ultra_Trig: Q1.1 R29.2 Ultra.2 | length 10.4
  Top Layer w0.3: Ultra.2 10.75,26.5 R29.2 14.825,23.575 Q1.1
pads on no net: Alim.3 Alim.10 Alim.11 S1.0 S2.0 S3.0 S4.0 Teensy.0 Teensy.1 Teensy.2 Teensy.13 Teensy.14 Teensy.15 Teensy.24 Teensy.25 Teensy.26 Teensy.27 Teensy.28 Teensy.29 Teensy.30 Teensy.31 Teensy.32 Teensy.33 Teensy.34 Teensy.35 Teensy.36 Teensy.37 Teensy.38 Teensy.39 Teensy.45 Teensy.46 Teensy.48 Teensy.49 Teensy.50 U1.1 U1.10 U2.1 U2.10

## Polygon pours and split planes (outlines as drawn)
GND_A on Top Layer "GND_A_L01_P000" (solid, remove dead copper, pour order 0): 0,0 91.5,0 ccw(c91.5,2) 93.5,2 93.5,70 0,70

## Silkscreen, mask and mechanical layers (free items; w line width, h text height)
Top Overlay:
  text "GND_A" at 16.722,59 h1.25 r270
  text "GND_L" at 22.222,59 h1.25 r270
  text "S2B2" at 64.5,58.989 h1 r180
  text "S2B1" at 67,58.989 h1 r180
  text "S2A1" at 69.5,58.989 h1 r180
  text "S2A2" at 72,58.989 h1 r180
  text "S1B2" at 84,58.989 h1 r180
  text "S1B1" at 86.5,58.989 h1 r180
  text "S1A1" at 89,58.989 h1 r180
  text "S1A2" at 91.5,58.989 h1 r180
  text "12V_A" at 16.722,54 h1.25 r270
  text "5V_A" at 82.322,54 h1 r90
  text "Carte Action / 2024-2025 / V1.0" at 22.36,52 h1.5
  text "SP1" at 82.489,51.143 h1 r90
  text "5V_A" at 16.722,49.5 h1.25 r270
  text "5V_L" at 22.222,49.5 h1.25 r270
  text "SP2" at 82.489,48.857 h1 r90
  text "SP3" at 82.489,46 h1 r90
  text "SP4" at 82.489,43.5 h1 r90
  text "GND_A" at 82.322,40.08 h1 r90
  text "5V_A" at 82.322,35 h1 r90
  text "GND_L" at 11.178,33.5 h1 r270
  text "N1" at 82.5,32.5 h1 r90
  text "Echo" at 11.01,30 h1 r270
  text "GND_A" at 82.322,28.62 h1 r90
  text "Trig" at 11.188,27.5 h1 r270
  text "5V_L" at 11.178,25 h1 r270
  text "5V_A" at 82.322,23.5 h1 r90
  text "N2" at 82.5,21 h1 r90
  text "GND_L" at 11.178,19.5 h1 r270
  text "GND_A" at 82.322,17.08 h1 r90
  text "Echo" at 11.01,16 h1 r270
  text "Trig" at 11.188,13.5 h1 r270
  text "5V_A" at 82.322,12 h1 r90
  text "5V_L" at 11.178,11 h1 r270
  text "SB1" at 82.489,9.5 h1 r90
  text "SB2" at 82.489,7 h1 r90
  text "GND_A" at 82.322,3 h1 r90
Mechanical 1:
  the board outline again, w0.254